# Altium PCB A313_10.PcbDoc
Units mm, origin at the board's own origin, x right, y up, seen from the top; angles counter-clockwise.
Board outline 60.07 x 80.14 mm, 2 copper layers (Top Layer, Bottom Layer); 11 components, 5 nets, 26 pads, 10 vias.
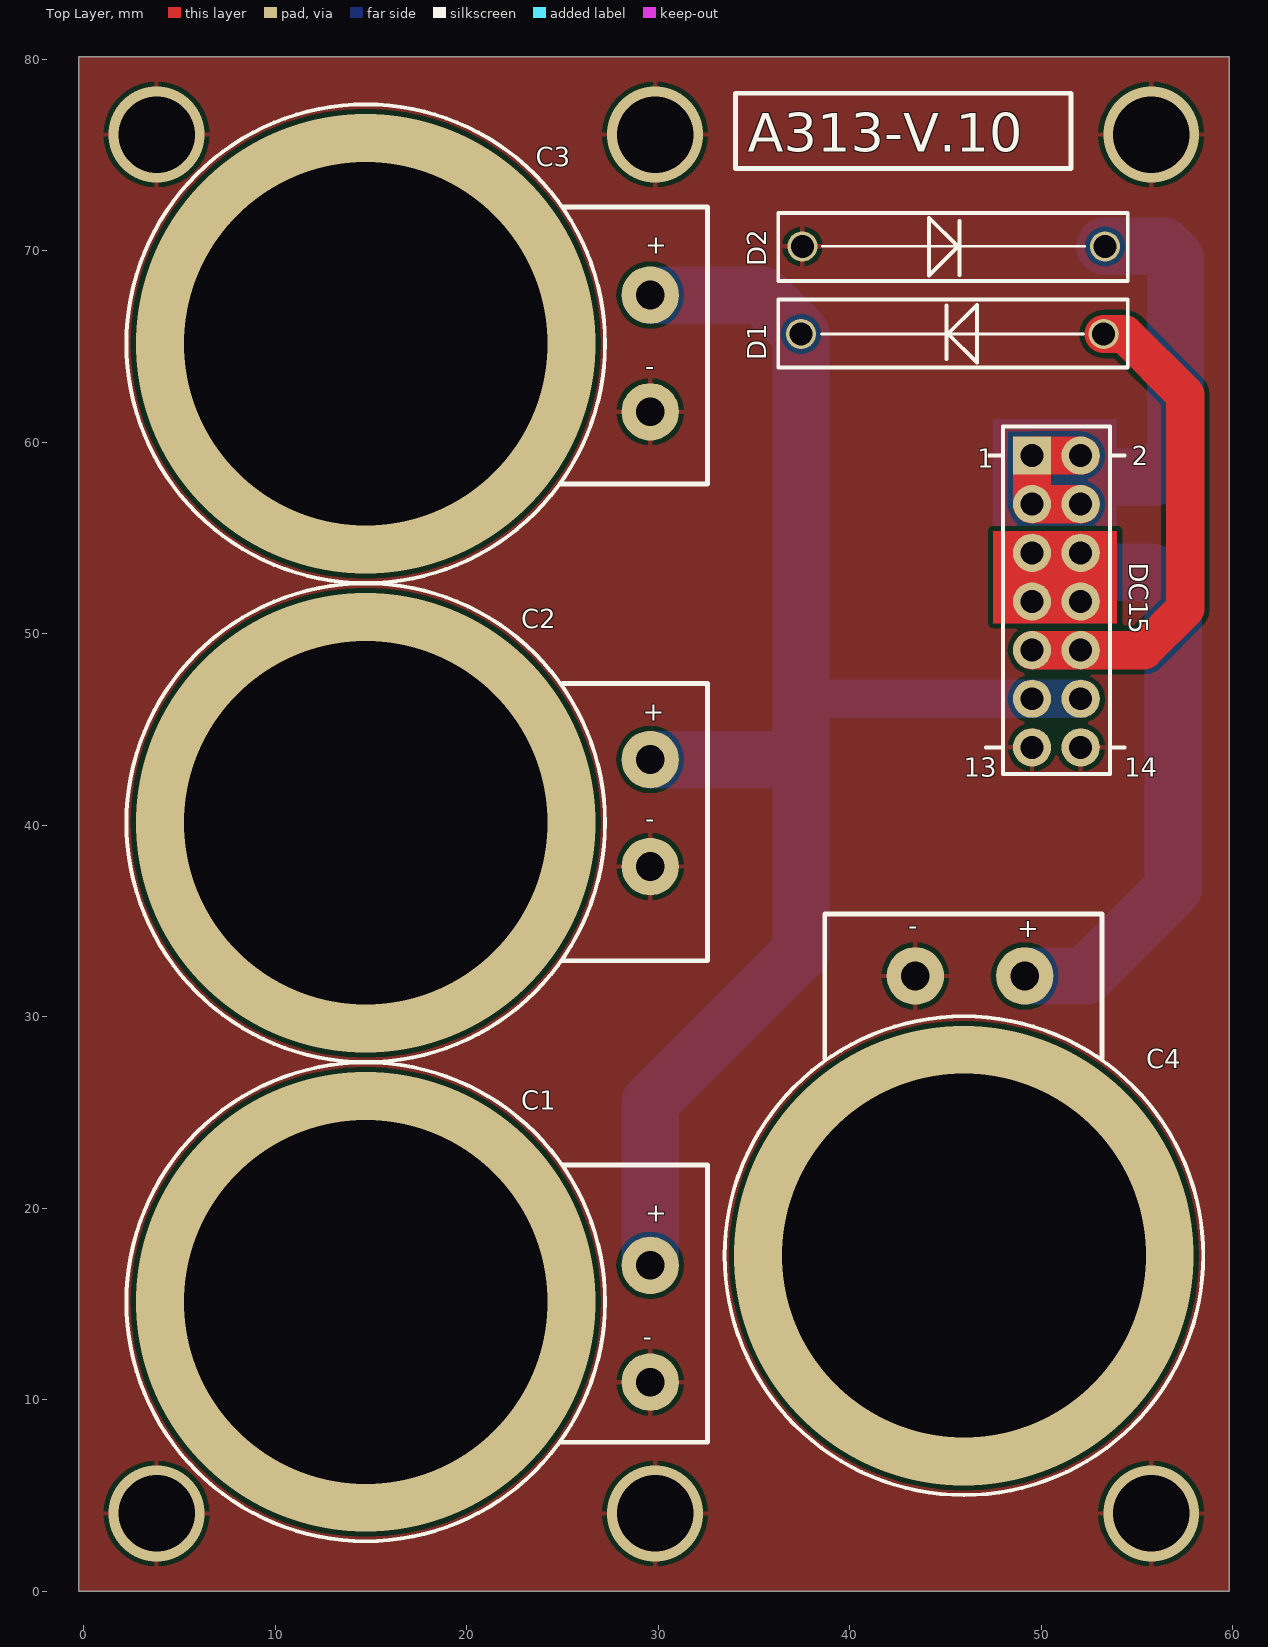
[diagram p0: Top Layer view]
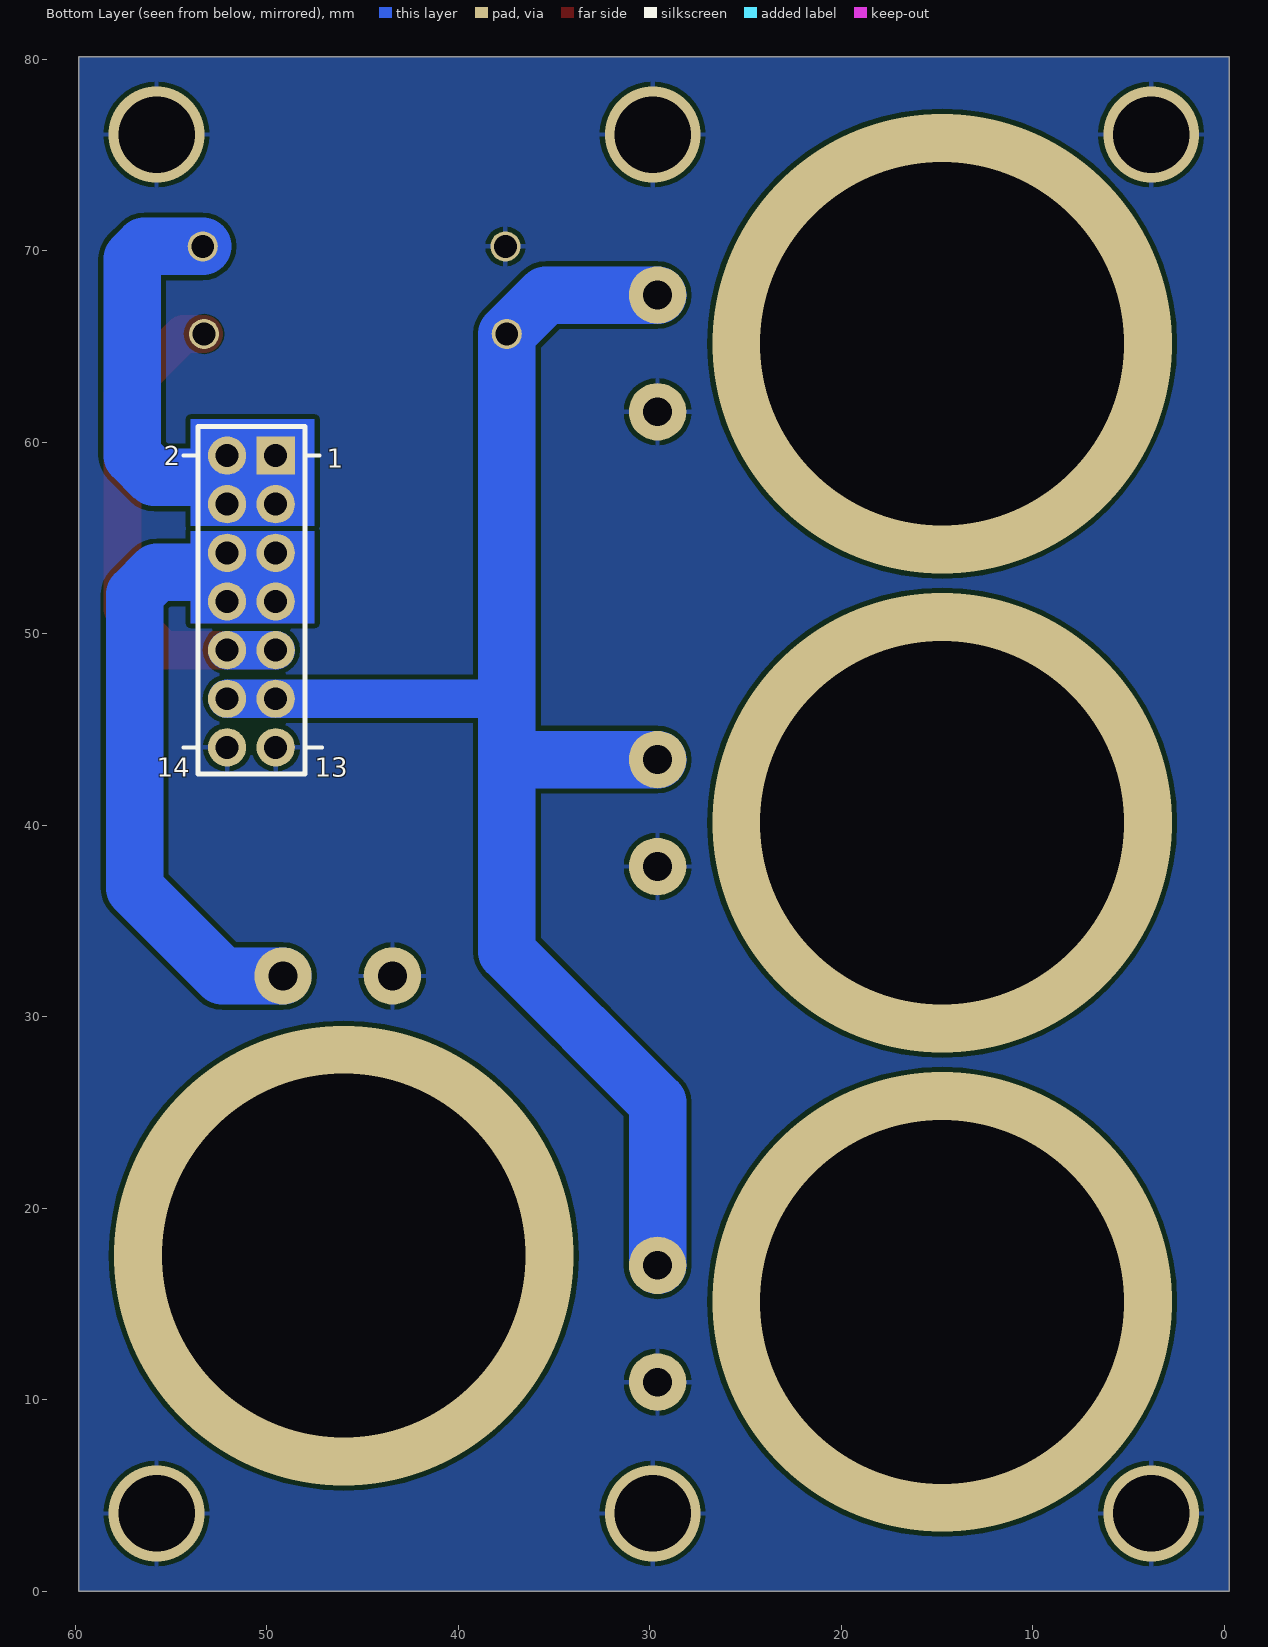
[diagram p1: Bottom Layer view, seen from below]

## Layer stack, top to bottom
Top Solder: solder mask 0.0102, Solder Resist, Dk 3.5
Top Layer: signal copper 0.0356
Dielectric1: dielectric 0.32, FR-4, Dk 4.8
Bottom Layer: signal copper 0.0356
Bottom Solder: solder mask 0.0102, Solder Resist, Dk 3.5

## Board outline
-0.254,80.137 -0.254,0 59.817,0 59.817,80.137 -0.254,80.137

## Design rules (kind name [scope] priority, off if disabled: settings)
Clearance [All] p1: gap=0.254 ignorepadtopadclearanceinfootprint=FALSE except(0: Arc-Hole Track-Hole SMDPad-Hole THPad-Hole Via-Hole Fill-Hole Poly-Hole Region-Hole Text-Hole)
HoleSize [All] p1: absolutevalues=TRUE maxlimit=20 minlimit=0.025 maxpercent=80.000 minpercent=20.000
PolygonConnect [All] p1: connectstyle=Relief reliefconductorwidth=0.254 reliefentries=4 polygonreliefangle="90 Angle" airgapwidth=0.254
RoutingVias [All] p1: holewidth=0.711 width=24 viastyle="Through Hole" minholewidth=0.711 minwidth=24 maxholewidth=0.711 maxwidth=24
SilkToSilkClearance [All] p1: silktosilkclearance=0
SilkToSolderMaskClearance SilkscreenOverComponentPads [IsPad] p1: minsilkscreentomaskgap=0 clearancetoexposedcopper=TRUE
SolderMaskExpansion [All] p1: expansion=0.102
Width [All] p1: maxlimit=3 minlimit=0.254 preferedwidth=2
27 further rules are at their usual default settings.

## Classes and differential pairs
component class A313_10: D1 D2 DC15

## Components (designator, comment, footprint, x,y, rotation, side; value= is the part's Value field where it differs from the comment)
+ "CON1" CON1 29.591,43.434 r0 top
+ "CON1" CON1 49.149,32.131 r0 top
+ "CON1" CON1 29.591,17.018 r0 top
- "CON1" CON1 29.591,37.846 r0 top
- "CON1" CON1 29.591,10.922 r0 top
- "CON1" CON1 43.434,32.131 r0 top
D1 "DIODE" "DIOT NAN" 37.42,65.56 r0 top
D2 "DIODE" "DIOT NAN" 53.387,70.33 r180 top
DC15 "" DC14C 45.847,48.641 r270 top
? "CON1" CON1 29.591,67.691 r0 top
? "CON1" CON1 29.591,61.595 r0 top

## Footprints (in the part's own frame and the unit in brackets; to place one, negate y for a bottom-side part, rotate by r counter-clockwise, add the part's x,y. Pads: shape width x height; smd on the part's side, far side on the other; paste and mask are expansions set on the pad)
CON1 [mm]
  round 3 hole 1.5: 1(0,0)
DC14C [mm]
  rect 2x2 hole 1.2: 1(-10.668,3.683)
  round 2 hole 1.2: 2(-10.668,6.223) 3(-8.128,3.683) 4(-8.128,6.223) 5(-5.588,3.683) 6(-5.588,6.223) 7(-3.048,3.683) 8(-3.048,6.223) 9(-0.508,3.683) 10(-0.508,6.223) 11(2.032,3.683) 12(2.032,6.223) 13(4.572,3.683) 14(4.572,6.223)
  silkscreen extent -12.19,1.27 5.97,8.51
"DIOT NAN" [mil]
  round 62 hole 47.23 mask+5: 1(624.1,3.89) 2(1.79,3.89)
  silkscreen extent -45,-65 674,75

## Part data
DC15: library part "Header 14", "Header, 14-Pin", LatestRevisionDate=17-Jul-2002, LatestRevisionNote="Re-released for DXP Platform.", Publisher="Altium Limited"

## Via types
v1: diameter 5, hole 4, Top Layer to Bottom Layer, 6 vias
v2: diameter 24, hole 19, Top Layer to Bottom Layer, 4 vias

## Nets (pads, with @x,y where several pads share a name; then routed paths per layer and width w, separated by ;. In a path a pad name is that pad's centre, name@x,y a point inside that pad or via, vN(x,y) a via of type N, cw(c..) or ccw(c..) an arc to the next point about the centre after c; other vN are vias at no path point)
+5V: D1.1 DC15.9 DC15.10 | length 28.2
  Top Layer w2: DC15.9 DC15.10 55.372,49.149 57.531,51.308 57.531,62.484 54.356,65.659 D1.1
  Bottom Layer w2: DC15.9 DC15.10
+27B: D2.2 DC15.1 DC15.2 DC15.3 DC15.4 | length 26.4
  Top Layer w2: DC15.4 DC15.3 DC15.1 DC15.2
  Bottom Layer w3: 52.959,58.166 55.88,58.166 57.023,59.309 57.023,69.596 56.388,70.231 D2.2
+27V: +.1@49.149,32.131 DC15.5 DC15.6 DC15.7 DC15.8 | length 37.2
  Bottom Layer w2: DC15.8 DC15.7 DC15.5 DC15.6
  Bottom Layer w3: +.1@49.149,32.131 52.324,32.131 56.896,36.703 56.896,52.07 55.753,53.213 52.832,53.213
GND: -.1 ?.1@29.591,61.595 D2.1 DC15.13 DC15.14
  other v1: 3.81,4.064 29.845,4.064 55.753,4.064 3.81,76.073 29.845,76.073 55.753,76.073
"VCC RAM": +.1@29.591,17.018 +.1@29.591,43.434 ?.1@29.591,67.691 D1.2 DC15.11 DC15.12 | length 83.2
  Bottom Layer w2: 37.465,46.482 37.592,46.609 DC15.11 DC15.12
  Bottom Layer w3: +.1@29.591,17.018 29.591,25.527 37.465,33.401 37.465,43.307 ; +.1@29.591,43.434 37.338,43.434 37.465,43.307 ; ?.1@29.591,67.691 35.433,67.691 D1.2 37.465,46.482 37.465,43.307
copper on no net:
  other v2: 14.732,15.113 45.974,17.526 14.732,40.132 14.732,65.151

## Polygon pours and split planes (outlines as drawn)
GND on Top Layer "Top Layer-No Net" (solid, remove dead copper, pour order 6): -0.254,80.137 -0.254,0 59.817,0 59.817,80.137 -0.254,80.137
GND on Bottom Layer "Top Layer-No Net1" (solid, pour order 7): -0.254,80.137 -0.254,0 59.817,0 59.817,80.137 -0.254,80.137

## Other copper
Top Layer:
  rectangle net +27V: 47.498,50.546 53.975,55.372
Bottom Layer:
  rectangle net +27V: 47.498,50.546 53.975,55.372
  rectangle net +27B: 47.498,55.626 53.975,61.214

## Silkscreen, mask and mechanical layers (free items; w line width, h text height)
Top Overlay:
  circle w0.2: c45.974,17.526 r12.5
  circle w0.2: c14.732,15.113 r12.5
  circle w0.2: c14.732,40.132 r12.5
  circle w0.2: c14.732,65.151 r12.5
  lines w0.254: 24.892,7.78 32.579,7.78 32.579,22.258 25.019,22.258 ; 24.892,57.818 32.579,57.818 32.579,72.296 25.019,72.296 ; 25.019,32.926 32.579,32.926 32.579,47.404 25.019,47.404 ; 38.702,27.813 38.702,35.373 53.18,35.373 53.18,27.813 ; 34.036,74.295 51.562,74.295 51.562,78.232 34.036,78.232 34.036,74.295
  text "A313-V.10" at 34.671,75.184 h2
  text "C3" at 23.622,74.422 h1
  text "+" at 29.337,69.85 h1
  text "-" at 29.337,63.5 h1
  text "C2" at 22.86,50.292 h1
  text "C4" at 55.499,27.305 h1
  text "C1" at 22.86,25.146 h1
Mechanical 1:
  circle w0.127: c3.783,4.08 r2
  circle w0.127: c55.783,4.08 r2
  circle w0.127: c29.783,4.08 r2
  circle w0.127: c55.783,76.08 r2
  circle w0.127: c29.783,76.08 r2
  circle w0.127: c3.783,76.08 r2
  circle w0.127: c14.783,15.08 r9.5
  circle w0.127: c14.783,40.08 r9.5
  circle w0.127: c45.926,17.493 r9.5
  circle w0.127: c14.783,65.08 r9.5
  lines w0.127: -0.217,0.08 -0.217,80.08 59.783,80.08 59.783,0.08 -0.217,0.08

## Text inside footprints (layer, text, board x,y; h text height)
DC15: Top Overlay "2" at 54.737,58.801 h1; Top Overlay "14" at 54.356,42.545 h1; Top Overlay "13" at 45.974,42.545 h1; Top Overlay "1" at 46.656,58.674 h1; Bottom Overlay "2" at 55.372,58.801 h1; Bottom Overlay "14" at 55.753,42.545 h1; Bottom Overlay "13" at 47.498,42.545 h1; Bottom Overlay "1" at 46.863,58.674 h1